# Altium PCB charging_device.PcbDoc (part 2 of 3)
Units mm, origin at the board's own origin, x right, y up, seen from the top; angles counter-clockwise.
Board outline 200.72 x 85.24 mm, 2 copper layers (Top Layer, Bottom Layer); 199 components, 123 nets, 612 pads, 55 vias.
Unrouted connection lines stored in the file: 5.
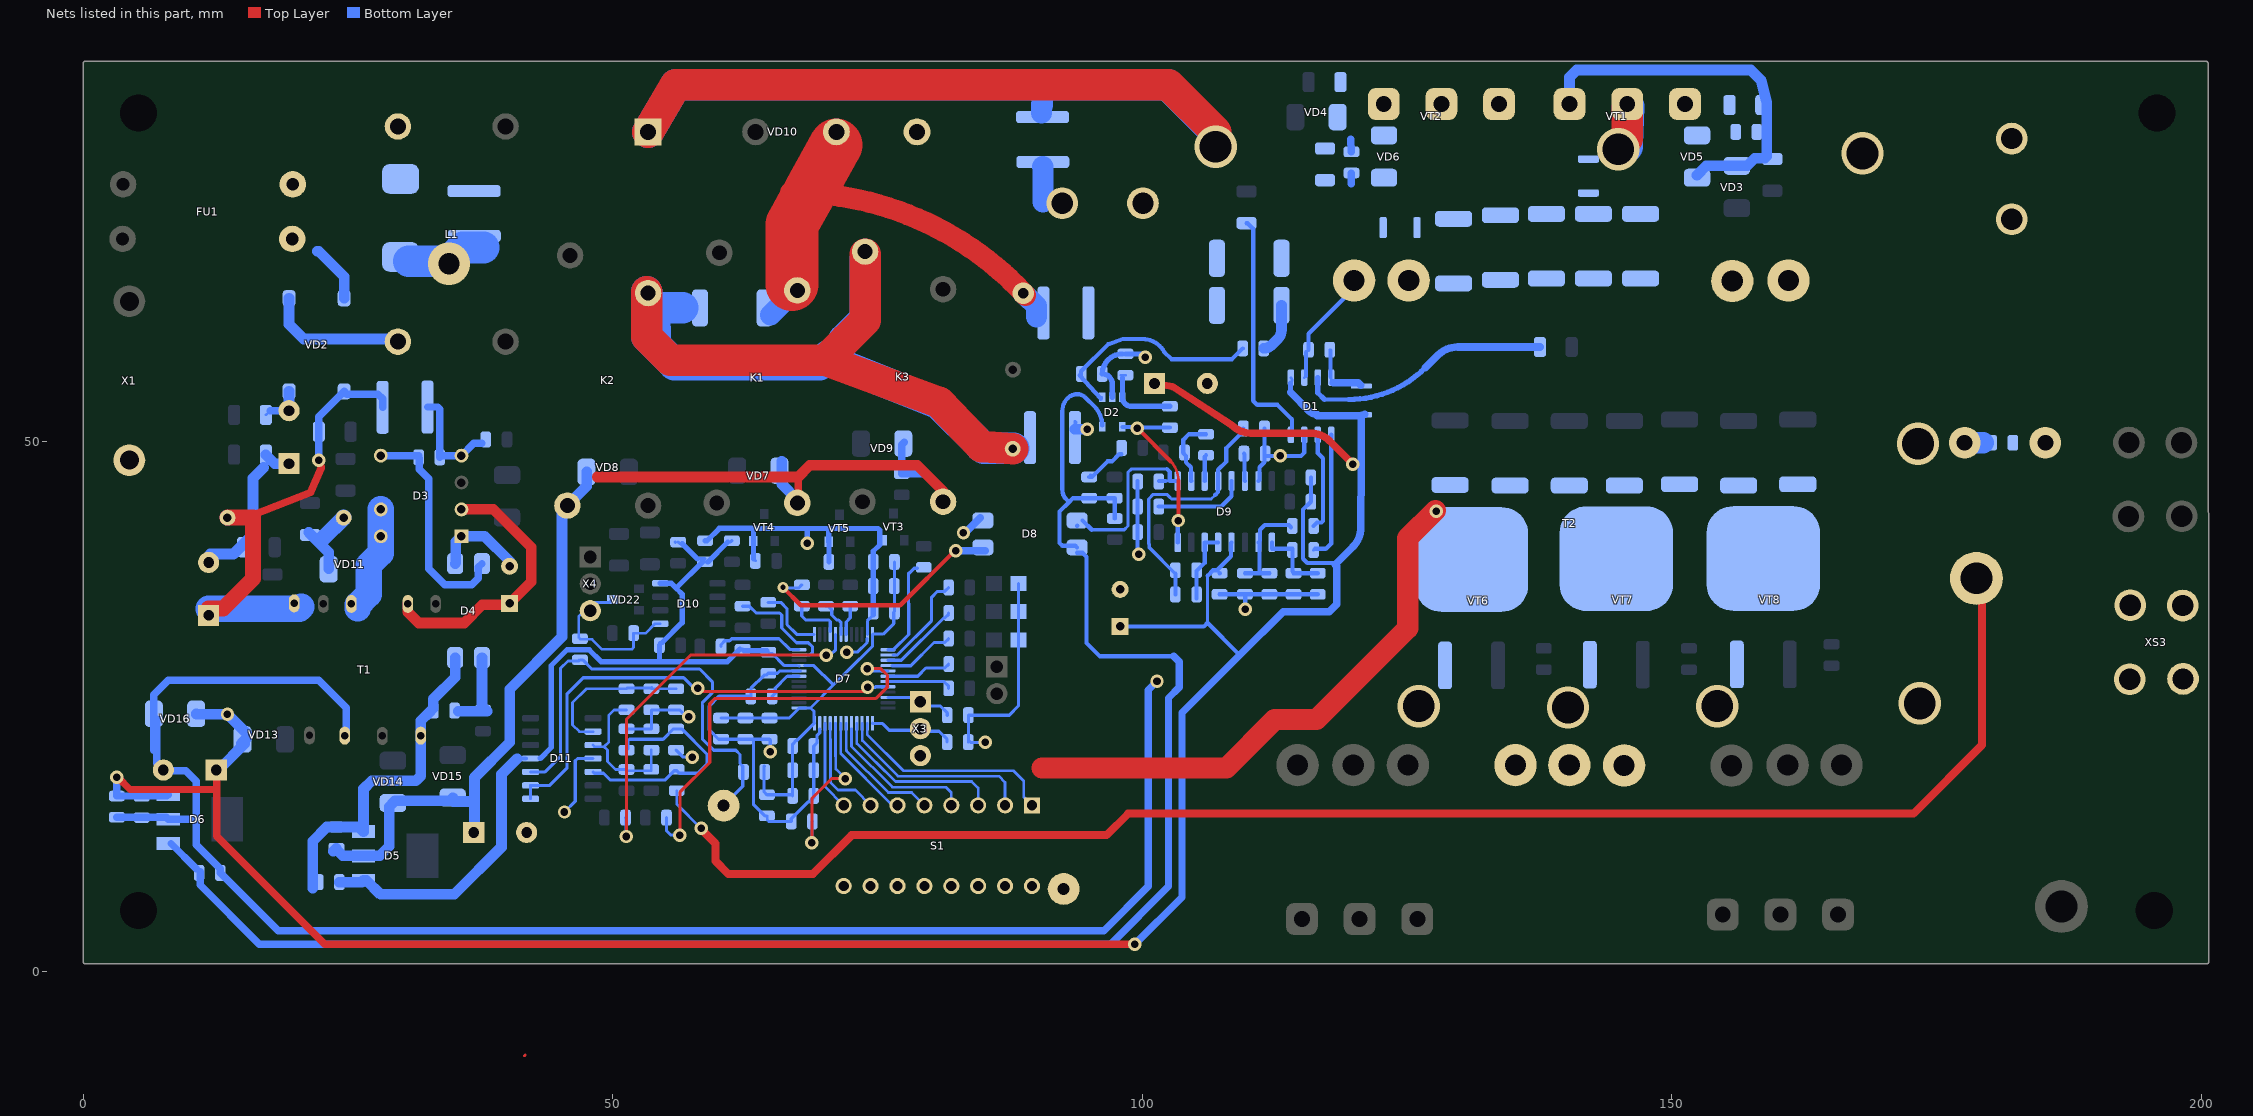
[diagram p2: the nets of this part, all layers, seen from the top]

## Part data (continued)
R46: library part R0805_IPC, "805, 27 kOhm, 1%", ManufacturePartName=0805S8F2702T5E, Part Name="Resistor 0805", ComponentLink1Description="on TME", ComponentLink1URL=https://www.tme.eu/en/details/smd0805-27k-1%25/smd-resistors/royal-ohm/0805s8f2702t5e/, Price="€ 0.00242"
R47: library part R0805_IPC, "0805, 100 Ohm, 1%", ManufacturePartName=0805S8F1000T5E, ComponentLink1Description="on TME", ComponentLink1URL=https://www.tme.eu/en/details/smd0805-100r-1%25/smd-resistors/royal-ohm/0805s8f1000t5e/, Part Name="Resistor 0805", Price="€ 0.00242"
R48 R49 R51: library part R0805_IPC, "0805, 100 Ohm, 5%", ManufacturePartName=0805S8J0101T5E, ComponentLink1Description="on TME", ComponentLink1URL=https://www.tme.eu/en/details/smd0805-100r/smd-resistors/royal-ohm/0805s8j0101t5e/, Part Name="Resistor 0805", Price="€ 0.00242"
R50: library part R0805_IPC, "0805, 24 kOhm, 1%", ManufacturePartName=0805WAF2402T10, ComponentLink1Description="on TME", ComponentLink1URL=https://www.tme.eu/ua/details/0805s8f2402t5e/rezistori-smd/royal-ohm/, Part Name="Resistor 0805", Price="€ 0.00242"
R52 R53 R54 R55 R56 R57 R58: library part R2512, "0.01 om, 1 w, ± 1%, 1500 ppm", ManufacturePartName=RL2512FK-070R01L, ComponentLink1Description="on Mouser", ComponentLink1URL=https://eu.mouser.com/ProductDetail/YAGEO/RL2512FK-070R01L?qs=BXCcY9r%252B08AD8tBH7JbvyA%3D%3D, Part Name="Resistor 2512", Price="€ 0,176"
R59 R60: library part R0805_IPC, "0805, 100 Ohm, 1%", ManufacturePartName=0805S8F1000T5E, Part Name="Resistro 0805", ComponentLink1Description="on TME", ComponentLink1URL=https://www.tme.eu/en/details/smd0805-100r-1%25/smd-resistors/royal-ohm/0805s8f1000t5e/, Price="€ 0.00242"
R61 R62 R63: library part R0805_IPC, "Resistor 0805, 5.1 kOhm, 5%, 0805S8J0512T5E", ManufacturePartName=0805S8J0512T5E, Part Name="Resistor 0805", Price=€0.01479
R64: library part R0805_IPC, "Resistor 0805, 510 Ohm, 5% 0805S8J0511T5E", ManufacturePartName=0805S8J0511T5E, Part Name="Resistor 0805", Price=€0.01479
R65: library part R0805_IPC, "Resisstor 0805, 51 kOhm, 5%, 0805S8J0513T5E", ManufacturePartName=0805WAJ0513T10, Part Name="Resistor 0805", Price=€0.01479
R66 R67: library part R0805_IPC, "Resistor 0805, 1 kOhm, 5%,  / 0805S8J0102T5E", ManufacturePartName=0805S8J0102T5E, Part Name="Resistor 0805", Price=€0.01479
R68: library part R0805_IPC, "Resistor 0805, 1 kOhm, 5%,  / 0805S8J0102T5E (1,8...500кОм) 50КГц", Part Name="Resistor 0805", ManufacturePartName=0805WAJ0102T10, Price=€0.01479
R69: library part R0805_IPC, "Resistor 0805, 1 kOhm, 5%,  / 0805S8J0102T5E", ManufacturePartName=0805WAJ0102T10, Part Name="Resistor 0805", Price=€0.01479
R70: library part R0805_IPC, "Ressistor 0805, 1 kOhm, 5% 0805S8J0102T5E", ManufacturePartName=0805WAJ0102T10, Part Name="Resistor 0805", Price=€0.01479
R71 R72 R73 R74: library part R0805_IPC, "Resistor 0805, 1 kOhm, 5%0805S8J0102T5E", ManufacturePartName=0805S8J0101T5E, Part Name="Resistor 0805", Price=€0.01160
R75: library part R0805MY, "Resistor 0805, 10 Ohm, 5% / 0805S8J0100T5E", ManufacturePartName=0805S8J0100T5E, Part Name="Resistor 0805", Price=€0.01160
R76: library part R2512, "Resistor 0805, 10 Ohm, 5% / 0805S8J0100T5E", ManufacturePartName=0805S8J0100T5E, Part Name="Resistor 0805", Price=€0.01160
R77: library part R1206_IPC, "Resistor 1206, 20 Ohm, 5%, 1206W4J0200T5E", ManufacturePartName=1206W4J0200T5E, ComponentLink1Description=datasheet, ComponentLink1URL=https://eu.mouser.com/datasheet/2/1365/1-3044649.pdf, ComponentLink2Description="on TME", ComponentLink2URL=https://www.tme.eu/ua/details/1206w4j0200t5e/rezistori-smd/royal-ohm/?brutto=0&currency=USD, Part Name="Resistor 1206", Price=$0.00280
R78 R80: library part R0805MY, "10 kOhm, 5%", ManufacturePartName=0805S8J0103T5E, Part Name="Resistor 0805", ComponentLink1Description="on TME", ComponentLink1URL=https://www.tme.eu/ua/ru/details/0805s8j0103t5e/rezistory-smd/royal-ohm/, Price=$0.00132
R79: library part R0805MY, "Resistor 1206, 20 Ohm, 5%, 1206W4J0200T5E", ManufacturePartName=1206W4J0200T5E, ComponentLink1Description="on TME", ComponentLink1URL=https://www.tme.eu/ua/details/1206w4j0200t5e/rezistori-smd/royal-ohm/?brutto=0&currency=USD, Part Name="Resistor 1206", Price=$0.00280
R81 R82 R83: library part R0805MY, "10 kOhm, 5%", ManufacturePartName=0805S8J0103T5E, ComponentLink1Description="on TME", ComponentLink1URL=https://www.tme.eu/ua/ru/details/0805s8j0103t5e/rezistory-smd/royal-ohm/, Part Name="Resistor 0805", Price=$0.00132
RU1: library part CU3225, "430 V 400 A Varistor 1 Circuit Surface Mount, MLCV 3225 (8063 Metric)", ManufacturePartName=B72650M0271K072, Part Name=Varistor, ComponentLink1Description="on digikey", ComponentLink1URL=https://www.digikey.at/en/products/detail/epcos-tdk-electronics/B72650M0271K072/1006567, Price=€0.46224
S1: library part SDIP16, "SMD_Switcher, DSHP08TSGET, 8-pins", ManufacturePartName=DSHP08TSGET, Part Name="Switcher smd", ComponentLink1Description="on Prom", ComponentLink1URL=https://prom.ua/ua/p2054320570-pereklyuchatel-dshp08tsget-pin.html, Price="42.12 ?"
T1: library part TRANS_2, "Transformator 74014_MYRRA", ManufacturePartName=74014_MYRRA, ComponentLink1Description="on TEM", ComponentLink1URL=https://www.tme.eu/ua/details/74010/transformatori-pcb/myrra/?brutto=0&currency=USD&gad_source=1&gclid=Cj0KCQjwxqayBhDFARIsAANWRnSOl6qUcqiiR8jCAnO5MGWbHAEPyGNAiL8MoGzMcmahcZQS1fRPZt0aAgjyEALw_wcB, Part Name=Transformator, Price="usd 2.22"
T2: library part TRANS_ETD_54_28_19, "ETD54/28/19 Ui=2400 AL=5580nH", ManufacturePartName=TP4A-ETD54/28/19, Part Name="Transformer core", ComponentLink1Description=Datasheet, ComponentLink1URL=https://www.tdk-electronics.tdk.com/inf/80/db/fer/etd_54_28_19.pdf, Price="54,00 грн*2, Voron"
VD1: library part 1N400X_VER, "RF Diode PIN - Single 400V 11.5 W", ManufacturePartName=MA4P7104F-1072T, Part Name="RF Diod, MACOM Technology", ComponentLink1Description="on digikey", ComponentLink1URL=https://www.digikey.at/en/products/detail/macom-technology-solutions/MA4P7104F-1072T/4429653, Price=€3.85500
VD2: library part DFXXS, "600 V Surface Mount 4-SDIP", ManufacturePartName=DF06STR-ND, Part Name="Bridge Rectifier Single Phase", ComponentLink1Description="on digikey", ComponentLink1URL=https://www.digikey.at/en/products/detail/onsemi/DF06S/974208, Price=€0.28516
VD3 VD4: library part 1N400X_VER, "Diode 40 V 1A Surface Mount SOD-123", ManufacturePartName=1N5819HW-7-F, Part Name="Diod smd", Price=$0.12274
  VD3: ComponentLink1Description="on Digikey", ComponentLink1URL=https://www.digikey.at/en/products/detail/diodes-incorporated/1N5819HW-7-F/814970
VD5 VD6: library part ZENER_SOD232, "20 V 500 mW ±5% Surface Mount SOD-123F", ManufacturePartName=MMSZ5250B, Part Name="Zener Diode", ComponentLink1Description="on digikey", ComponentLink1URL=https://www.digikey.at/en/products/detail/diotec-semiconductor/MMSZ5250B/22190821, Price=€0.04660
VD7 VD8 VD9: library part VD7_5, "1000 V 1A Surface Mount DO-214AC (SMA)", ManufacturePartName=S1M, Part Name=Diode, ComponentLink1URL=https://www.digikey.at/en/products/detail/smc-diode-solutions/S1M/6022596, Price=€0.03636, Vaue="1000 V, 1 A"
  VD7: ComponentLink1Description="on Didikey"
  VD8 VD9: ComponentLink1Description="on Digikey"
VD10: library part 4GBXXX, "Single Phase Standard 1 kV Through Hole GBJ", ManufacturePartName=GBJ3510, Part Name="Bridge Rectifier Single Phase", ComponentLink1Description="on digikey", ComponentLink1URL=https://www.digikey.at/en/products/detail/smc-diode-solutions/GBJ3510/7244896, Price=€0.79502
VD11 VD12: library part 1N4148WS, "100V 1A, SMA", ManufacturePartName="SS110 SMA", Part Name="DIODE SCHOTTKY", ComponentLink1URL=https://www.digikey.si/en/products/detail/smc-diode-solutions/SS110/16184148, Price=€0.05678
  VD11: ComponentLink1Description=onDigikey
  VD12: ComponentLink1Description="on Digikey"
VD13 VD14: library part 1N4148WS, "DIODE SCHOTTKY - SS110 SMA, 100V 1A, SMA", ManufacturePartName="SS110 SMA", Part Name="DIODE SCHOTTKY", ComponentLink1Description="on Digikey", ComponentLink1URL=https://www.digikey.si/en/products/detail/smc-diode-solutions/SS110/16184148, Price=€0.05678
VD15: library part BZV55, "4.3 V 500 mW ±5% Surface Mount LLDS; MiniMelf", ManufacturePartName=BZV55-C4V3, Part Name="Zener Diode", ComponentLink1Description="on digikey", ComponentLink1URL=https://www.digikey.si/en/products/detail/nexperia-usa-inc/BZV55-C4V3-115/1155576, Price=€0.05858
VD16: library part BZV55, "24.4V Clamp 16.4A Ipp Tvs Diode Surface Mount DO-214AC", ManufacturePartName=SMAJ15A, Part Name="TVS DIODE", ComponentLink1Description="on digikey", ComponentLink1URL=https://www.digikey.si/en/products/detail/w%C3%BCrth-elektronik/SMAJ15A/11479345, Price=$0.19900
VD17: library part KP-2012SURK, "Led, FYLS-0805HD, червоний.", ManufacturePartName=FYLS-0805HD, Part Name="Led smd", ComponentLink1Description="on kosmodrom", ComponentLink1URL=http://www.kosmodrom.com.ua/prodlist.php?page=0&name=fyls-0805, Price="2.5 грн"
VD18: library part KP-2012SURK, "Led, FYLS-0805PGC, Зелений.", ManufacturePartName=FYLS-0805HD, Part Name="Led smd", ComponentLink1Description="on Kosmodrom", ComponentLink1URL=http://www.kosmodrom.com.ua/prodlist.php?page=0&name=fyls-0805, Price="2.5 грн"
VD19: library part KP-2012SURK, "Led, FYLS-0805BUWC, Білий.", ManufacturePartName=FYLS-0805BUWC, Part Name="Led smd", ComponentLink1Description="on Kosmodrom", ComponentLink1URL=http://www.kosmodrom.com.ua/prodlist.php?page=0&name=fyls-0805, Price="2.5 грн"
VD20 VD21: library part D_2IN1, "1 Pair Common Cathode 200 V 15A Through Hole TO-247-3", ManufacturePartName=MUR3020WTPBF, Part Name="Diode Array", ComponentLink1Description="on digikey", ComponentLink1URL=https://www.digikey.si/en/products/detail/vishay-general-semiconductor-diodes-division/VS-MUR3020WTPBF/811527?s=N4IgTCBcDaILIFUBKBmADGNB1AKgBQCEAxEAXQF8g, ComponentLink2Description=datasheet, ComponentLink2URL=https://www.vishay.com/docs/94080/vs-mur3020wt-n3.pdf
  VD20: Price="65,25 грн/шт,Imrad"
  VD21: Price="65,25 грн/шт, Imrad"
VD22: library part CDSOT23-SM712, "26V, 14V Clamp 17A (8/20µs) Ipp Tvs Diode Surface Mount SOT-23-3", Part Name="Diode Surface Mount", ComponentLink1Description="on digikey", ComponentLink1URL=https://www.digikey.si/en/products/detail/bourns-inc/CDSOT23-SM712/1630592?s=N4IgTCBcDaIMIBEDKB5AKmAzAWiQWQHYBGCAXQF8g, ManufacturePartName=CDSOT23-SM712, Price=$0.80900
VT1 VT2: library part IRG4PH30, "N-Channel 900 V 11.5A (Tc) 54W (Tc) Through Hole TO-247-3", ManufacturePartName=C3M0280090D, Part Name="Transistor TO - 247 - 3", ComponentLink1Description="on digikey", ComponentLink1URL=https://www.digikey.at/en/products/detail/wolfspeed-inc/C3M0280090D/5764683, Price=€4.93000
VT3 VT4 VT5: library part IRLML2803, "N-Channel Enhancement-Mode MOSFET (TMOS), IRLML2803, 30V; 1.2A; 0.4W; SOT23", ManufacturePartName=IRLML2803TRPBF, Part Name="Transistor SOT-23", ComponentLink1Description="on digikey", ComponentLink1URL=https://www.digikey.si/en/products/detail/infineon-technologies/IRLML2803TRPBF/811435, Price=€0.13148
VT6: library part IRG4PH30, "N-Channel 75 V 80A (Tc) 140W (Tc) Surface Mount D2PAK", ManufacturePartName=IRFS3607PBF-ND, Part Name="Transistor D2PAK", ComponentLink1Description="on digikey", ComponentLink1URL=https://www.digikey.si/en/products/detail/infineon-technologies/IRFS3607PBF/1928144?s=N4IgTCBcDaIJICUBiBlAzANgAwHYAKARkiALoC%2BQA, Price=$1.42
VT7 VT8: library part IRG4PH30, "Transistor - IRFS3607PbF,   / N-Channel 75 V 80A (Tc) 140W (Tc) Surface Mount D2PAK", ManufacturePartName=IRFS3607PBF-ND, Part Name="Transistor D2PAK", ComponentLink1Description="on digikey", ComponentLink1URL=https://www.digikey.si/en/products/detail/infineon-technologies/IRFS3607PBF/1928144?s=N4IgTCBcDaIJICUBiBlAzANgAwHYAKARkiALoC%2BQA, Price=$1.42
X1: library part DG300-7.5-3P, "2EDGRC-7.5-03P-14-00A(H), Клема вилка винтова кутова,7,5 мм,кількість контактів 3: 15А 300В зелена,на плату", Part Name="Pluggable terminal block", ComponentLink1Description="on TME", ComponentLink1URL=https://www.tme.eu/en/details/2edgrc-7.5-03p/pluggable-terminal-blocks/degson-electronics/2edgrc-7-5-03p-14-00a-h/, ManufacturePartName=2EDGRC-7.5-03P-14-00A(H), Price=0.248
X2: library part DG301S-5.0-02P, "Terminal Block - Terminal Block - 15EDGRC-2.5-02P-14-00L(H), 2 Position  Header, Male Pins, 2.5mm", ManufacturePartName=15EDGRC-2.5-02P-14-00L(H), Part Name=Connector, ComponentLink1Description="on Digikey", ComponentLink1URL=https://www.digikey.kr/en/products/detail/degson/15EDGRC-3-5-02P-14-00L-H/22266315, Price=?1,200.00000
X3: library part PLS3_ukr, "PLS-40-BLACK, Планка штирьова на плату пряма, крок 2,54мм 1x40 контакт. Колір: чорний. Контакты 6 и 3 мм", ManufacturePartName="PLS-40 BLACK", Part Name="Планка штирьова на плату", ComponentLink1Description="on kosmodrom", ComponentLink1URL=http://www.kosmodrom.com.ua/prodlist.php?name=PLS-40&page=0, Price=грн2,50
X4: library part DG301S-5.0-03P, "DG308-2.54-03P-14-00AH, 3P, 2.54mm", ManufacturePartName=DG308-2.54-03P, Part Name="Connector DG", ComponentLink1Description=data, ComponentLink1URL=https://biakom.com/store/119873-na-platu/26815-dg308-254-03p-14-00ah, ComponentLink2Description="on TME", ComponentLink2URL=https://www.tme.eu/ua/ru/details/dg308-2.54-03p/klemmnye-kolodki-dlia-pechatnykh-plat/degson-electronics/dg308-2-54-03p-14-00ah/, Price=$0.342
XS3: ManufacturePartName=*PCB-11(M4)FIX&FASTEN, Part Name=Connector, ComponentLink1Description="on TME", ComponentLink1URL=https://www.tme.eu/ua/ru/details/pcb-11m4/paechnye-shtifty-pcb/fix-fasten/pcb-11-m4/, Price=0.242
XS4: "0.01 om, 1 w, ± 1%  / 1500 ppm/K", ComponentLink1Description="on TME", ComponentLink1URL=https://www.tme.eu/ua/ru/details/pcb-11m4/paechnye-shtifty-pcb/fix-fasten/pcb-11-m4/
XS1: PDIF_I_PID=XT1, PDIF_TY=11100
XS2: PDIF_I_PID=XT1

## Free pads (board coordinates)
  round 1.524 hole 3.5: 24(5.204,81.026) 24(5.207,5.715) 24(195.58,5.715) 24(195.834,81.026)

## Via types
v1: diameter 1.27, hole 0.711, Top Layer to Bottom Layer, 36 vias
v2: diameter 4, hole 3, Top Layer to Bottom Layer, 15 vias
v3: diameter 1.016, hole 0.508, Top Layer to Bottom Layer, 2 vias
v4: diameter 4, hole 2, Top Layer to Bottom Layer, 1 vias
v5: diameter 2, hole 1, Top Layer to Bottom Layer, 1 vias

## Nets (pads, with @x,y where several pads share a name; then routed paths per layer and width w, separated by ;. In a path a pad name is that pad's centre, name@x,y a point inside that pad or via, vN(x,y) a via of type N, cw(c..) or ccw(c..) an arc to the next point about the centre after c; other vN are vias at no path point)
"+ 3.3V": C25.1 C32.2 C33.2 C34.2 C35.2 C36.2 C37.2 C38.2 C39.2 C40.2 C41.2 C42.2 C55.2 D5.2 D7.1 D7.9 D7.24 D7.48 D10.8 D11.4 R25.2 R80.2 R81.1 R82.1 R83.1 | length 126.5
  Bottom Layer w0.254: D7.9@67.597,28.842 D7.9@67.628,28.811 ; 70.773,27.064 70.9,27.064
  Bottom Layer w0.3: 54.208,29.218 54.414,29.424 ; R83.1@54.414,31.017 R83.1@54.676,31.017 ; R80.2@55.906,40.505 R80.2@55.914,40.497 ; 56.049,36.101 56.049,36.215 ; R80.2@56.176,40.505 56.303,40.378 R80.2@56.553,40.378 ; C55.2@58.002,38.929 C55.2@58.685,38.929 ; C55.2@58.466,38.632 C55.2@58.716,38.632 ; C39.2@60.24,23.893 C35.2@62.526,23.893 C32.2@64.812,23.893 66.679,23.893 D7.1@67.597,24.811 ; R81.1@60.864,40.514 61.129,40.514 R81.1@61.256,40.641 R81.1@61.248,40.649 ; R82.1@62.022,30.402 R82.1@62.272,30.402 R82.1@62.415,30.259 ; R25.2@64.288,19.337 64.304,19.337 64.288,19.321 64.288,16.924 C42.2@64.558,16.654 66.876,16.654 C37.2@66.987,16.543 C41.2@66.987,18.956 C34.2@66.987,21.242 66.987,21.425 67.351,21.789 67.444,21.789 D7.48@69.047,23.392 ; C38.2@64.542,30.259 C38.2@64.685,30.116 64.812,29.989 65.062,29.989 66.209,28.842 D7.9@67.381,28.842 ; D7.1@67.597,24.842 68.678,24.842 ; D7.9@68.114,28.842 68.995,28.842 70.773,27.064 ; D7.48@69.016,23.392 69.016,24.504 68.678,24.842 ; C33.2@76.607,38.641 C40.2@76.607,33.942 76.533,33.868 76.533,32.811 75.537,31.815 74.57,31.815 D7.24@74.547,31.792 74.547,30.697 72.242,28.392 72.242,28.405 70.9,27.064 68.678,24.842
  Bottom Layer w0.4: 40.969,20.066 D11.4@41.783,20.066
  Bottom Layer w0.5: 43.17,20.082 44.196,21.108 44.196,28.855 45.68,30.34 47.777,30.34 48.899,29.218 54.208,29.218 60.838,29.218 R82.1@62.022,30.402 ; 54.414,29.424 R83.1@54.414,30.767 ; D10.8@54.492,36.609 55.541,36.609 55.922,36.228 ; R83.1@54.676,31.017 56.557,32.898 56.557,35.593 56.049,36.101 ; 56.049,36.215 C55.2@58.466,38.632 ; R80.2@56.553,40.378 C55.2@58.002,38.929 ; C55.2@58.982,38.632 R81.1@60.864,40.514 ; R82.1@62.415,30.259 C38.2@64.542,30.259
  Bottom Layer w1: C25.1@24.193,8.398 26.291,8.398 D5.2@26.464,8.571 26.735,8.571 28.075,7.231 28.083,7.239 35.028,7.239 39.497,11.708 39.497,18.594 40.969,20.066
"+ 5V": C20.1 C22.1 D5.3 K1.4 K2.1 K3.4 R39.1 VD7.2 VD8.2 VD9.2 VD14.2 VD15.2 | length 104.8
  Top Layer w0.254: K1.4@67.437,44.212 K1.4@67.503,44.277
  Top Layer w0.7: K1.4@67.513,44.531 67.513,46.658
  Top Layer w1: 48.536,46.658 67.513,46.658 68.623,47.768 78.767,47.768 K3.4@81.18,45.355
  Bottom Layer w0.7: VD9.2@77.517,49.927 77.295,49.705 R39.1@77.295,46.974 79.597,46.974 K3.4@81.216,45.355
  Bottom Layer w1: C22.1@23.609,11.307 C22.1@23.906,11.605 ; C22.1@24.033,11.357 24.519,10.871 D5.3@26.464,10.871 28.008,10.871 28.908,11.77 28.908,15.531 VD14.2@29.24,15.864 29.438,16.062 VD15.2@34.828,16.062 ; VD15.2@34.885,16.381 34.979,16.288 34.979,16.01 36.949,16.01 ; C20.1@36.949,13.16 36.949,16.01 ; VD8.2@47.53,47.133 47.53,45.768 K2.1@45.72,43.958 45.212,43.45 45.212,31.579 40.259,26.626 40.259,21.59 36.949,18.28 36.949,16.01 ; VD7.2@65.96,48.149 65.96,45.99 K1.4@67.484,44.466
"+ 310V PWR": C10.2 C12.1 C14.2 VD10.1 VT1.2 | length 131.1
  Top Layer w3: VD10.1@53.34,79.248 55.961,83.693 102.489,83.693 106.934,79.248 v2(106.934,77.851) ; v2(144.961,77.613) 144.961,77.763 145.807,78.608 VT1.2@145.807,81.534
  Bottom Layer w0.254: 90.48,83.693 90.592,83.581
  Bottom Layer w2: C14.2@90.48,81.026 90.48,81.859 90.592,81.747 90.592,83.581
  Bottom Layer w3: VD10.1@53.34,79.248 55.974,83.693 90.48,83.693 102.415,83.693 106.807,79.301 v2@106.807,77.363 ; v2(144.961,77.613) 145.21,77.862 145.807,77.862 145.813,78.069 VT1.2@145.923,81.641
  other v2: 168.021,77.216
GND: C20.2 C22.2 C25.2 C28.1 C29.1 C30.1 C31.1 C32.1 C33.1 C34.1 C35.1 C36.1 C37.1 C38.1 C39.1 C40.1 C41.1 C42.1 C43.1 C47.1 C48.1 C55.1 D4.2 D5.1 D7.8 D7.23 D7.47 D8.2 D10.5 D11.11 R24.2 R32.2 R38.2 R42.2 R45.1 R52.2 R53.2 R54.2 R55.2 R56.2 R57.2 R58.2 R60.1 R78.1 S1.9 S1.10 S1.11 S1.12 S1.13 S1.14 S1.15 S1.16 T1.10 VD17.2 VD18.2 VD19.2 VD22.3 VT3.2 VT4.2 VT5.2 VT6.2 VT7.2 VT8.2 X3.3 X4.3 XS2.1 | length 219.1
  Top Layer w0.254: 41.643,-8.007 41.743,-7.907 ; v1@68.368,40.286 v1(68.368,40.413)
  Top Layer w2: 90.533,19.177 107.95,19.177 112.522,23.749 116.459,23.749 125.074,32.364 125.074,40.873 v1@127.698,43.497
  Bottom Layer w0.254: X4.3@47.413,33.936 X4.3@47.244,33.936 ; VD22.3@49.953,35.085 49.674,34.805 48.114,34.805 X4.3@47.244,33.936 ; D10.5@54.492,32.799 54.017,32.799 53.128,31.91 R78.1@51.969,31.91 51.969,30.551 51.82,30.402 48.959,30.402 48.036,31.325 46.966,31.325 C28.1@46.905,31.386 46.778,31.513 46.778,33.469 X4.3@47.244,33.936 ; R38.2@63.288,38.925 R38.2@63.479,38.735 ; VT4.2@63.288,40.622 VT4.2@63.288,40.856 ; C42.1@64.558,14.654 64.595,14.618 64.595,14.262 64.743,14.113 65.938,14.113 65.955,14.13 ; C29.1@83.576,21.623 83.592,21.639 83.67,21.717 83.797,21.59 v1(85.18,21.59)
  Bottom Layer w0.3: v1(45.445,15.018) 46.461,16.034 46.461,19.861 46.67,20.071 D11.11@48.141,20.071 ; C43.1@51.303,22.868 C48.1@53.652,22.868 C47.1@53.652,24.659 R60.1@55.986,24.659 56.302,24.659 56.942,24.019 v1(57.192,24.019) ; R45.1@55.986,20.865 56.653,20.198 v1(57.51,20.198) ; C42.1@64.558,14.654 64.375,14.654 63.288,15.74 63.288,21.893 ; v1(64.876,20.706) 64.876,21.829 C32.1@64.812,21.893 63.288,21.893 ; 65.955,14.13 R32.2@66.86,14.13 66.86,14.38 68.476,15.996 68.624,15.996 68.987,16.359 C37.1@68.987,16.543 C41.1@68.987,18.956 C34.1@68.987,21.242 69.284,21.539 69.284,22.232 69.547,22.495 D7.47@69.547,22.868 ; D7.8@67.733,28.329 65.764,28.329 65.551,28.116 C38.1@64.685,28.116 64.517,27.948 64.304,27.948 63.05,26.694 C31.1@63.05,25.941 60.029,25.941 59.109,25.021 59.109,22.774 59.99,21.893 C39.1@60.24,21.893 C35.1@62.526,21.893 63.288,21.893 ; v1(72.115,30.116) 73.107,30.116 74.02,31.029 D7.23@74.02,31.374 ; D7.23@74.047,31.792 74.047,33.065 C40.1@74.607,33.625 ; C29.1@83.592,21.639 C30.1@83.592,24.163 87.443,24.163 88.307,25.027 VD19.2@88.307,31.275 VD18.2@88.307,33.942 VD17.2@88.307,36.609
  Bottom Layer w0.5: C55.1@58.716,40.632 58.9,40.632 60.073,41.805 63.628,41.805 ; R38.2@63.288,38.925 VT4.2@63.288,40.622 ; VT4.2@63.288,40.856 63.288,41.791 70.4,41.791 ; v1(68.368,40.413) 68.368,41.683 ; R42.2@70.416,38.641 70.416,40.53 VT5.2@70.4,40.546 70.4,41.791 ; C40.1@74.607,33.625 C40.1@74.607,33.942 C33.1@74.607,38.641 74.607,39.64 75.226,40.259 75.226,41.621 75.057,41.791 70.4,41.791
  Bottom Layer w0.7: v1(83.125,41.402) 83.28,41.402 D8.2@84.693,42.815
  Bottom Layer w1: 21.669,7.835 21.669,12.262 23.011,13.605 C22.2@23.906,13.605 26.03,13.605 D5.1@26.464,13.171 26.464,17.195 27.227,17.957 31.418,17.957 31.877,18.416 T1.10@31.877,22.225 31.877,23.623 32.669,24.416 32.669,24.421 33.05,24.802 33.05,25.687 35.116,27.752 D4.2@35.116,29.591
  other v1: 127.762,43.434
"GND  PWR": C1.2 C5.1 C8.1 C9.1 C13.2 C14.1 C23.2 C24.2 C26.2 C27.2 C49.2 C50.1 C51.1 C53.1 C54.1 C56.1 D1.3 D2.2 D6.2 D9.7 R4.1 R10.2 R12.2 R61.1 R63.1 R67.1 R68.2 R69.2 R72.1 R74.1 T1.8 VD10.4 VD16.1 | length 212.4
  Bottom Layer w0.254: C14.1@90.617,75.946 C14.1@90.617,76.403 ; C8.1@93.65,51.181 93.65,51.918 C8.1@93.776,51.792 ; v1(94.807,51.181) 94.998,51.181 v1@95.124,51.307 ; D2.2@97.016,54.356 D2.2@97.016,54.556 ; R4.1@98.125,58.277 R4.1@98.425,58.277 ; v1@99.946,58.277 cw(c99.946,57.943) v1(100.28,57.943)
  Bottom Layer w0.4: C56.1@94.996,46.656 C56.1@95.246,46.656 ; C56.1@95.121,46.781 C56.1@95.246,46.656 ; R63.1@98.045,48.811 97.833,48.811 97.155,48.133 96.731,48.133 95.25,46.652 C56.1@95.246,46.656 ; R67.1@99.569,41.445 99.568,39.497 v1(99.695,39.37) ; R67.1@99.569,41.445 C51.1@99.569,43.858 R61.1@99.569,46.271 ; C50.1@107.315,35.576 C54.1@109.71,35.576 ; v1(109.728,34.163) 109.728,35.558 C54.1@109.71,35.576 ; D9.7@110.98,46.275 111.081,46.376 111.081,47.581 111.554,48.054 R68.2@111.554,48.72 ; R69.2@111.554,51.244 R68.2@111.554,48.72 ; D1.3@115.316,50.64 115.316,48.969 114.988,48.641 v1(113.046,48.641) 111.633,48.641 R68.2@111.554,48.72 ; R72.1@116.586,35.576 C53.1@114.3,35.576 R74.1@112.014,35.576 C54.1@109.71,35.576
  Bottom Layer w0.5: D2.2@97.183,54.18 97.183,55.441 ccw(c96.236,55.441) C5.1@96.236,56.388 cw(c98.125,56.388) R4.1@98.125,58.277 ; R4.1@98.425,58.277 v1@99.946,58.277
  Bottom Layer w0.7: C27.2@3.175,14.526 7.834,14.526 D6.2@8.019,14.341 10.531,14.341 10.668,14.478 ; 6.666,20.857 VD16.1@6.666,24.289 6.666,26.099 8.031,27.464 22.255,27.464 24.846,24.873 T1.8@24.846,21.901 ; VD16.1@6.92,23.778 6.928,23.77 6.928,19.618 C24.2@7.563,18.983 C24.2@7.643,18.903 ; C24.2@7.742,18.804 C24.2@7.643,18.903 ; v1(101.4,27.359) 100.584,26.543 100.584,8.001 96.393,3.81 18.415,3.81 13.085,9.14 12.938,9.287 12.938,9.668 10.668,11.938 10.668,14.478 ; C24.2@7.643,18.903 9.686,18.903 10.668,17.921 10.668,14.478
  Bottom Layer w1: C8.1@93.65,51.181 v1(94.807,51.181)
  Bottom Layer w2: C14.1@90.617,75.946 90.627,75.936 90.627,72.63
NetC1_1: C1.1 C23.1 C24.1 C27.1 C49.1 C50.2 D1.5 D6.3 D9.12 R71.2 R73.2 VD1.1 VD13.2 VD16.2 | length 249
  Top Layer w0.7: v1(3.175,18.288) 3.272,18.288 4.415,17.145 12.603,17.145 ; C24.1@12.603,18.407 12.603,17.145 ; v1(99.314,2.54) 22.795,2.54 12.603,12.732 12.603,17.145 ; C1.1@101.161,55.487 102.864,55.196 108.476,51.544 ccw(c110.272,53.34) 110.272,50.8 115.915,50.8 cw(c115.915,48.26) 117.711,50.056 v1(119.888,47.879)
  Bottom Layer w0.254: 109.151,29.909 109.283,29.909 ; D1.5@114.046,56.04 cw(c113.739,55.733) D1.5@114.173,55.733
  Bottom Layer w0.3: 106.172,32.887 106.172,35.044 106.161,35.055 106.161,37.311 106.172,37.322
  Bottom Layer w0.4: C49.1@97.917,32.54 105.825,32.54 106.172,32.887 109.151,29.909 ; 106.172,37.322 106.696,37.846 107.061,37.846 108.384,39.169 108.384,40.419 D9.12@108.44,40.475 ; C50.2@107.315,37.576 C50.2@107.324,37.576 ; R71.2@115.935,46.609 R73.2@115.935,44.323 115.189,43.577 115.189,38.937 115.596,38.53 118.061,38.53 118.212,38.379 118.364,38.227
  Bottom Layer w0.44: 114.01,54.646 D1.5@114.01,55.571
  Bottom Layer w0.7: v1(3.175,18.288) C27.1@3.175,16.526 7.904,16.526 D6.3@8.019,16.641 ; v1(99.314,2.54) 103.759,6.985 103.759,24.384 109.283,29.909 113.317,33.942 117.657,33.942 118.364,34.649 118.364,38.227 ; 114.01,54.646 115.781,52.875 ccw(c116.499,53.594) 116.499,52.578 ; 116.54,52.451 VD1.1@120.691,52.451 ; 118.212,38.379 119.906,40.072 ccw(c118.11,41.868) 120.65,41.868 120.673,47.876 VD1.1@120.691,52.451 ; VD1.1@121.031,52.578 120.747,52.472 VD1.1@120.691,52.451
  Bottom Layer w1: VD16.2@10.666,24.289 10.692,24.263 13.593,24.263 v1(13.619,24.236) 15.429,22.426 15.429,22.003 VD13.2@14.909,21.483 ; C24.1@12.095,18.729 12.78,19.413 12.78,19.022 VD13.2@15.24,21.483
NetC2_1: C2.1 C15.1 C18.1 R15.2 R19.2 T1.6 VD2.3 | length 44.4
  Top Layer w0.254: 16.032,42.815 16.032,43.069
  Top Layer w0.7: 16.032,43.069 21.464,45.196 22.5,47.564 v1(22.233,48.246)
  Top Layer w1.5: C15.1@11.841,34.235 13.215,34.235 16.032,37.051 16.032,42.815 C18.1@13.617,42.815
  Bottom Layer w0.7: v1(22.233,48.246) 22.249,48.262 R19.2@22.249,50.927 22.249,52.355 VD2.3@24.631,54.737 24.885,54.483 27.834,54.483 28.27,54.047 C2.1@28.27,53.238
  Bottom Layer w2: 15.905,34.235 16.032,34.362 ; 19.334,34.235 T1.6@19.461,34.362
  Bottom Layer w2.5: C15.1@11.841,34.235 15.905,34.235 19.334,34.235 20.416,34.235 20.604,34.423
NetC2_2: C2.2 C16.2 C17.2 C19.1 D3.1 D3.4 D4.3 R18.1 R22.2 VD2.4 | length 23.3
  Bottom Layer w0.254: R18.1@17.248,52.527 R18.1@17.64,52.919
  Bottom Layer w0.7: R18.1@17.64,52.919 C16.2@19.431,52.919 ; C2.2@32.512,53.264 33.468,53.264 33.669,53.063 C19.1@33.669,48.514 33.828,48.673 D3.4@35.717,48.673 36.868,49.824 R22.2@37.656,49.824
  Bottom Layer w1: C16.2@19.431,52.919 VD2.4@19.431,54.737 ; D4.3@35.116,38.481 35.19,38.556 35.19,40.526 D3.1@35.717,41.053 37.894,41.053 40.259,38.687 C17.2@40.259,38.222
NetC3_1: C3.1 C6.1 D1.6 R8.1 R11.2 R84.2 R85.2 R86.2 R87.2 T2.20 T2.21 VD5.1 VT1.3 VT2.2 | length 11.1
  Bottom Layer w0.254: D1.6@115.316,56.04 D1.6@115.475,56.199 ; C3.1@115.475,58.437 C3.1@115.712,58.674 ; T2.21@120.091,64.667 T2.21@120.091,65.202
  Bottom Layer w0.4: D1.6@115.475,56.199 C3.1@115.475,58.437 ; C3.1@115.712,58.674 115.712,60.186 T2.21@120.142,64.616
NetC3_2: C3.2 D1.8 VD1.2 | length 6
  Bottom Layer w0.254: C3.2@117.712,58.674 C3.2@117.784,58.602 ; D1.8@117.784,56.112 D1.8@117.856,56.04 117.856,55.713 D1.8@118.027,55.542
  Bottom Layer w0.4: D1.8@117.784,56.112 C3.2@117.784,58.602
  Bottom Layer w0.7: D1.8@118.027,55.542 120.416,55.542 VD1.2@120.65,55.308
NetC4_1: C4.1 L1.4 RU1.1 VD2.1 X1.3 | length 22.1
  Bottom Layer w0.254: RU1.1@29.972,67.437 30.322,67.437 RU1.1@30.728,67.031 ; v4(34.544,66.802) v4@34.544,67.031
  Bottom Layer w1: VD2.1@19.431,63.537 19.431,61.087 20.828,59.69 L1.4@29.718,59.69
  Bottom Layer w3: RU1.1@30.728,67.031 34.544,67.031 35.839,68.326 37.803,68.326
NetC4_2: C4.2 FU1.2 L1.1 RU1.2 VD2.2 | length 5.6
  Bottom Layer w1: 22.098,67.977 22.233,67.977 24.631,65.578 VD2.2@24.631,63.537
NetC5_2: C5.2 D2.1 R7.2 | length 21.4
  Bottom Layer w0.254: C5.2@94.096,56.261 C5.2@94.236,56.134 ; D2.1@96.093,54.053 D2.1@96.19,54.18
  Bottom Layer w0.4: C5.2@94.096,56.261 D2.1@96.093,54.053 ; C5.2@94.234,56.134 94.234,56.642 96.774,59.182 98.171,59.69 100.045,59.69 ; 100.045,59.684 cw(c100.045,57.37) 101.788,58.892 ; 101.783,58.888 cw(c100.018,57.346) 102.076,58.468 102.759,57.785 108.474,57.785 R7.2@109.49,58.801
NetC6_2: C6.2 R5.1 R8.2 VD3.1 VD5.2 VT1.1 | length 35.3
  Bottom Layer w1: VT1.1@140.357,82.399 140.357,84.393 141.054,85.09 157.48,85.09 158.472,84.098 158.951,82.168 158.98,82.049 158.98,76.962 158.788,76.77 157.861,76.77 157.132,76.041 VD3.1@156.163,76.041 153.277,76.041 VD5.2@152.4,75.164
NetC7_1: C7.1 C11.1 R7.1 R9.1 R10.1 R12.1 VD6.1 VT2.3 | length 5.9
  Bottom Layer w0.7: 119.761,74.323 C7.1@119.761,75.363
  Bottom Layer w1: R7.1@111.49,58.801 ccw(c111.49,59.826) 112.214,59.101 112.804,59.69 ccw(c111.946,60.548) 113.159,60.548 R10.1@113.159,62.865
NetC7_2: C7.2 R6.1 R9.2 VD4.1 VD6.2 VT2.1 | length 1.2
  Bottom Layer w0.7: 119.69,78.571 C7.2@119.761,77.363
NetC8_2: C8.2 K2.3 K3.2 R13.1 R14.1 | length 113.1
  Top Layer w0.254: 72.04,59.659 73.655,59.659
  Top Layer w3: K2.3@53.213,64.135 53.213,59.911 55.451,57.674 70.056,57.674 ; K3.2@73.85,67.691 73.85,61.468 72.848,60.466 72.04,59.659 70.056,57.674 ; R14.1@87.77,49.327 84.836,49.53 80.803,53.721 70.056,57.674
  Bottom Layer w3: K2.3@53.213,64.135 53.213,62.643 53.213,59.911 54.038,59.087 ; 56.592,62.643 53.911,62.643 54.038,59.087 ; 71.85,59.595 73.85,61.595 K3.2@73.85,67.247 ; R14.1@87.846,49.364 85.064,49.364 84.836,49.592 84.789,49.592 80.806,53.575 71.138,57.442 70.346,58.091 69.532,57.277 55.847,57.277 54.038,59.087
NetC9_2: C9.2 K1.3 R13.2 VD10.3 | length 45.5
  Top Layer w0.254: v5@88.773,63.925 v5(88.773,64.008)
  Top Layer w2: 66.802,73.533 cw(c66.802,43.326) 68.576,73.481 cw(c66.802,43.326) v5@88.884,63.937 ; v5(88.773,64.008) 88.806,64.008 v5@88.99,63.824
  Top Layer w5: K1.3@66.929,64.822 66.929,70.499 68.183,72.77 68.544,73.422 68.576,73.481 VD10.3@71.074,78.004
  Bottom Layer w0.254: K1.3@67.433,64.287 K1.3@67.437,64.278
  Bottom Layer w2: R13.2@64.907,61.968 67.345,64.406 K1.3@67.48,64.541 ; v5@88.99,63.824 90.006,62.808 90.006,61.781
NetC10_1: C10.1 C11.2 R11.1 R84.1 R85.1 R86.1 R87.1
NetC12_2: C12.2 C13.1 T2.13 T2.14
NetC15_2: C15.2 C16.1 R16.1 R17.2 | length 14.3
  Bottom Layer w1: C15.2@11.841,39.235 11.992,39.386 14.191,39.386 16.032,41.227 16.032,46.532 17.054,47.554 ; R17.2@17.248,48.768 18.097,47.919 C16.1@19.431,47.919
NetC17_1: C17.1 D3.2 T1.2 | length 26
  Top Layer w1: T1.2@30.658,34.671 30.658,33.905 31.698,32.865 35.963,32.865 37.687,34.589 C17.1@40.392,34.589 ; D3.2@35.717,43.593 38.735,43.593 42.291,40.037 42.291,36.754 C17.1@40.259,34.722
  Bottom Layer w0.4: D3.2@35.717,43.593 D3.2@35.86,43.45
NetC18_2: C18.2 R21.1 VD11.2 | length 7
  Bottom Layer w1: R21.1@21.288,41.418 22.24,40.465 23.176,39.529 VD11.2@23.176,38.005
  Bottom Layer w1.5: 22.597,40.823 C18.2@24.59,42.815
NetC19_2: C19.2 D3.5 D4.4 | length 21.7
  Bottom Layer w0.7: D3.5@28.097,48.673 31.669,48.673 C19.2@31.669,48.514 31.738,48.445 31.738,47.383 32.639,46.482 32.639,37.973 34.136,36.476 36.681,36.476 37.306,37.1 37.306,38.131 D4.4@37.656,38.481
NetC26_1: C26.1 C56.2 D2.5 D6.1 D8.4 R62.2 R66.2 | length 168.7
  Bottom Layer w0.254: 92.964,54.102 92.972,54.11 ; D2.5@96.233,51.436 D2.5@96.233,51.51
  Bottom Layer w0.4: 92.964,54.102 ccw(c94.19,52.876) 92.456,52.876 92.456,45.466 ccw(c93.797,45.466) 92.849,44.518 93.091,44.275 ; 92.972,54.11 cw(c93.853,53.228) 93.853,54.475 cw(c93.853,53.346) 94.651,54.144 95.489,53.306 cw(c93.693,51.51) D2.5@96.233,51.51 ; D8.4@93.853,39.497 94.361,39.497 94.742,39.116 94.742,30.988 96.012,29.718 102.997,29.718 ; D8.4@93.853,40.005 93.686,40.172 92.456,40.172 92.202,40.426 92.202,43.386 93.091,44.275 ; R66.2@97.409,42.736 97.409,44.643 R62.2@97.396,44.656 C56.2@94.996,44.656 93.472,44.656 93.091,44.275
  Bottom Layer w0.7: D6.1@8.285,12.041 C26.1@10.668,9.658 ; C26.1@11.049,9.398 11.049,8.128 16.637,2.54 97.028,2.54 102.489,8.001 102.489,25.781 103.505,26.797 103.505,29.21 102.997,29.718
NetC28_2: C28.2 D11.3 R25.1 XS1.1 | length 42.9
  Bottom Layer w0.254: 58.465,25.128 58.465,25.34
  Bottom Layer w0.3: D11.3@42.241,18.801 43.616,18.801 45.064,20.249 45.064,28.567 45.774,29.278 46.797,29.278 C28.2@46.905,29.386 47.155,29.386 48.023,28.518 58.207,28.518 59.415,27.31 59.415,26.289 58.465,25.34 ; 58.465,25.128 58.465,21.909 59.531,20.844 61.63,20.844 62.022,20.452 62.022,19.603 62.288,19.337 62.288,17.445 XS1.1@60.469,15.626
NetC29_2: C29.2 D7.37 X3.2 | length 7.9
  Bottom Layer w0.3: D7.37@74.547,23.392 74.57,23.369 75.487,23.369 76.115,22.741 78.934,22.741 79.036,22.639 80.81,22.639 81.576,21.873 C29.2@81.576,21.623
NetC30_2: C30.2 D7.34 X3.1 | length 6.4
  Bottom Layer w0.3: D7.34@75.997,25.842 78.373,25.842 79.036,25.179 79.188,25.027 80.941,25.027 81.592,24.376 C30.2@81.592,24.163
NetC31_2: C31.2 D7.7 | length 3.6
  Bottom Layer w0.3: C31.2@65.05,25.941 65.347,26.238 65.347,26.705 66.463,27.821 66.495,27.821 66.516,27.842 D7.7@67.597,27.842
NetC43_2: C43.2 D11.12 R45.2 R46.1 | length 22.7
  Bottom Layer w0.3: D11.12@48.141,18.801 48.269,18.673 49.132,18.673 49.766,18.039 50.644,18.039 50.652,18.031 54.931,18.031 55.812,18.912 56.062,18.912 56.3,18.674 58.018,18.674 58.907,19.563 58.907,20.468 56.51,22.865 R45.2@55.986,22.865 55.736,22.865 54.764,21.893 51.585,21.893 51.414,21.722 51.414,20.979 C43.2@51.303,20.868
NetC44_1: C44.1 C45.2 L2.2 R46.2 XS3.1 | length 147.8
  Top Layer w0.762: v1@58.372,13.351 59.69,12.032 59.69,10.381 60.912,9.16 68.896,9.16 72.54,12.804 ; 72.54,12.827 96.647,12.827 98.679,14.859 172.847,14.859 179.324,21.336 L2.2@179.324,35.941
  Bottom Layer w0.254: R46.2@56.049,17.039 56.049,15.787 v1(58.358,13.478)
NetC44_2: C44.2 C45.1 T2.5 T2.6 T2.7 VT6.3 VT7.3 VT8.3 | length 1.8
  Bottom Layer w2: C44.2@177.673,49.886 179.428,49.886
  other v2: 140.208,24.892 126.111,25.019 154.305,25.019 173.444,25.273 173.274,49.784
NetC46_1: C46.1 C47.2 D11.9 R60.2 | length 14.7
  Bottom Layer w0.254: D11.9@48.141,22.611 46.845,22.611 46.207,23.249 46.207,25.342 47.524,26.659 C46.1@51.303,26.659 51.366,26.722 53.636,26.722 C47.2@53.7,26.786 ; C47.2@53.652,26.659 R60.2@55.986,26.659
NetC46_2: C46.2 C48.2 D11.10 R50.1 R59.2 | length 14.1
  Bottom Layer w0.254: D11.10@48.141,21.341 48.299,21.182 49.191,21.182 ; C46.2@51.303,24.659 50.132,24.659 49.636,24.163 49.636,21.626 49.191,21.182 ; C48.2@53.652,20.868 53.652,18.912 51.414,18.912 51.302,19.023 50.283,19.023 49.509,19.797 49.509,20.865 49.191,21.182
NetC51_2: C51.2 D9.5 | length 8.7
  Bottom Layer w0.4: C51.2@101.569,43.858 107.467,43.858 108.44,44.831 D9.5@108.44,46.275
NetC52_1: C52.1 D9.4 R69.1 R70.2 | length 24.3
  Bottom Layer w0.254: 100.615,40.358 100.648,40.324 ; 102.616,44.735 102.616,44.726 102.765,44.577 106.52,44.577 106.912,44.969
  Bottom Layer w0.3: 100.615,44.546 100.615,44.579 101.048,45.012 102.339,45.012 102.616,44.735
  Bottom Layer w0.33: 100.615,40.358 100.615,44.546 ; 100.648,40.324 100.648,40.008 R70.2@103.14,37.516
  Bottom Layer w0.4: C52.1@103.14,35.56 R70.2@103.14,37.516 ; 106.912,44.969 107.17,45.227 D9.4@107.17,46.275 107.17,47.335 107.95,48.116 107.95,49.391 109.554,50.994 R69.1@109.554,51.244
NetC52_2: C52.2 D9.13 D9.14 R70.1 | length 6.9
  Bottom Layer w0.4: C52.2@105.14,35.179 105.14,37.516 105.14,37.766 105.9,38.526 D9.14@105.9,40.475 D9.13@107.17,40.475
NetC53_2: C53.2 D9.9 R72.2 R75.2 | length 7.2
  Bottom Layer w0.4: D9.9@112.25,40.475 112.25,39.896 112.268,39.878 114.189,39.878 114.189,39.497 114.189,37.764 C53.2@114.377,37.576 ; C53.2@114.3,37.576 C53.2@114.377,37.576 ; R72.2@116.586,37.576 C53.2@114.377,37.576
NetC54_2: C54.2 D9.10 R74.2 R76.2 | length 9.7
  Bottom Layer w0.4: C54.2@109.71,37.576 111.081,37.576 ; R74.2@112.014,37.576 111.081,37.576 ; R76.2@114.062,41.91 113.86,42.112 111.581,42.112 111.139,41.67 111.139,40.634 D9.10@110.98,40.475 111.081,40.374 111.081,37.576
NetD1_1: D1.1 R75.1 | length 12.2
  Bottom Layer w0.254: R75.1@116.189,39.751 cw(c116.316,39.751) R75.1@116.316,39.878
  Bottom Layer w0.4: R75.1@116.316,39.878 117.348,39.878 117.856,40.386 D1.1@117.856,50.64
NetD1_2: D1.2 R76.1 | length 9.4
  Bottom Layer w0.4: R76.1@116.189,42.037 116.499,42.347 116.933,42.347 117.081,42.496 117.081,48.427 116.586,48.923 D1.2@116.586,50.64
NetD1_4: D1.4 R2.2 | length 23
  Bottom Layer w0.4: R2.2@109.855,70.625 109.955,70.625 110.49,70.089 110.49,53.848 110.871,53.467 112.776,53.467 114.145,52.098 114.145,50.739 D1.4@114.046,50.64
NetD1_7: D1.7 R3.2 | length 24.2
  Bottom Layer w0.254: 129.747,58.928 129.794,58.928
  Bottom Layer w0.4: 117.221,53.975 119.511,53.975
  Bottom Layer w0.5: D1.7@116.586,56.04 116.586,54.61 117.221,53.975 ; 119.511,53.975 ccw(c119.511,64.189) 126.734,56.967
  Bottom Layer w0.7: 126.734,56.967 127.951,58.184 cw(c129.747,56.388) 129.747,58.928
  Bottom Layer w0.78: 129.794,58.928 R3.2@137.565,58.928
NetD2_3: D2.3 R1.1 R4.2 | length 7.7
  Bottom Layer w0.254: R4.2@97.978,56.277 R4.2@98.425,56.277 ccw(c98.425,55.985) R4.2@98.133,55.985
  Bottom Layer w0.5: R4.2@98.133,55.985 D2.3@98.133,54.18 ccw(c98.99,54.18) 98.99,53.324 R1.1@102.616,53.324
NetD2_4: D2.4 D9.16 R1.2 | length 16.3
  Top Layer w0.254: 102.676,48.147 cw(c100.88,46.351) 103.42,46.351
  Top Layer w0.4: v1(99.557,51.267) 102.676,48.147 ; v1(103.42,42.545) 103.42,46.351
  Bottom Layer w0.254: v1(99.557,51.267) cw(c99.614,51.267) 99.558,51.279 cw(c99.614,51.267) v1@99.614,51.324 ; v1@103.36,42.399 cw(c103.566,42.399) v1(103.42,42.545)
  Bottom Layer w0.4: D2.4@98.133,51.38 v1@99.043,51.38 ; v1@99.614,51.324 R1.2@102.616,51.324 ; D9.16@103.36,40.475 v1@103.36,42.399
NetD3_7: D3.7 D3.8 T1.4 VD11.1 | length 10.2
  Bottom Layer w2.5: 25.938,34.245 25.938,34.576 26.954,35.592 26.954,38.33 28.097,39.473 D3.8@28.097,41.053 D3.7@28.097,43.593
NetD4_1: D4.1 R23.2 R24.1 | length 7.9
  Bottom Layer w1: R24.1@35.412,24.543 38.13,24.543 R23.2@37.984,24.689 ; D4.1@37.656,29.591 37.656,24.747 R23.2@37.749,24.654
NetD7_11: D7.11 R26.1 | length 10.4
  Bottom Layer w0.3: R26.1@62.272,34.466 62.284,34.455 62.903,34.455 63.542,33.815 65.764,33.815 65.955,33.624 65.955,32.393 67.352,30.996 68.476,30.996 68.876,30.596 68.876,30.105 68.613,29.842 D7.11@67.987,29.842
NetD7_12: D7.12 R27.1 | length 8.2
  Bottom Layer w0.3: R27.1@60.224,30.64 60.224,30.823 60.588,31.187 61.041,31.187 61.231,31.377 65.701,31.377 66.705,30.373 D7.12@67.597,30.373
NetD7_13: D7.13 R28.1 | length 6.5
  Bottom Layer w0.3: R28.1@64.685,34.815 65.864,34.815 66.463,34.215 66.463,32.71 67.381,31.792 D7.13@69.016,31.792
NetD7_16: D7.16 R31.1 | length 4.8
  Bottom Layer w0.3: R31.1@67.86,34.466 67.86,33.526 68.231,33.155 70.398,33.155 70.547,33.006 D7.16@70.547,32.059
NetD7_17: D7.17 R44.2 | length 36.8
  Top Layer w0.3: v1(51.287,12.705) 51.287,23.754 57.375,29.842 v1(70.146,29.842)
  Bottom Layer w0.3: R44.2@51.207,14.483 51.247,14.443 51.247,12.745 v1(51.287,12.705) ; v1(70.146,29.842) 70.562,29.842 71.051,30.331 D7.17@71.051,31.792
NetD7_18: D7.18 R36.2 | length 3.5
  Bottom Layer w0.3: R36.2@70.146,34.466 70.33,34.466 70.693,34.102 70.693,33.624 71.162,33.155 71.329,33.155 71.547,32.937 D7.18@71.547,31.792
NetD7_19: D7.19 R41.2 | length 2.8
  Bottom Layer w0.3: D7.19@72.047,31.792 72.047,32.637 72.047,32.96 72.432,33.345 R41.2@72.432,34.466
NetD7_25: D7.25 R37.1 | length 9.9
  Bottom Layer w0.3: D7.25@75.997,30.342 D7.25@76.547,30.342 ; D7.25@75.997,30.373 76.547,30.373 77.957,31.783 77.957,32.009 77.919,37.573 78.001,37.573 78.466,38.038 R37.1@78.782,38.038
NetD7_26: D7.26 R35.2 | length 9.2
  Bottom Layer w0.3: D7.26@76.496,29.842 76.866,29.842 80.116,33.091 80.116,35.295 80.675,35.855 81.356,35.855 81.719,36.219 R35.2@81.719,36.228
NetD7_27: D7.27 R33.2 | length 7.6
  Bottom Layer w0.3: D7.27@75.997,29.345 77.258,29.345 81.252,33.338 81.356,33.338 81.719,33.702 R33.2@81.719,33.815
NetD7_28: D7.28 R34.2 | length 6.4
  Bottom Layer w0.3: D7.28@76.369,28.837 78.147,28.837 80.339,31.029 81.356,31.029 81.719,31.393 R34.2@81.719,31.402
NetD7_29: D7.29 R47.2 | length 39
  Top Layer w0.3: v1(56.34,12.843) 56.34,16.869 59.161,19.69 59.161,25.251 59.656,25.747 74.87,25.747 75.925,26.802 75.925,27.691 75.946,27.713 75.946,27.923 75.305,28.565 v1(74.02,28.565)
  Bottom Layer w0.3: R47.2@55.081,14.483 55.081,13.229 55.467,12.843 v1(56.34,12.843) ; v1(74.02,28.565) 74.242,28.342 D7.29@75.997,28.342
NetD7_30: D7.30 R29.1 | length 6.2
  Bottom Layer w0.3: D7.30@75.997,27.842 78.803,27.842 79.577,28.616 81.356,28.616 81.719,28.98 R29.1@81.719,28.989
NetD7_31: D7.31 R30.1 | length 6.1
  Bottom Layer w0.3: D7.31@75.997,27.342 81.264,27.342 81.719,26.886 R30.1@81.719,26.703
NetD7_32: D7.32 D11.1 D11.2 | length 44.1
  Top Layer w0.3: v1(58.018,26.703) 58.323,26.397 73.675,26.397 v1(74.063,26.786)
  Bottom Layer w0.254: D11.1@42.241,16.261 D11.2@42.241,17.531
  Bottom Layer w0.3: D11.2@42.241,17.531 44.058,17.531 45.676,19.148 45.676,26.144 47.223,27.691 56.696,27.691 57.693,26.694 58.008,26.694 v1(58.018,26.703) ; v1(74.063,26.786) 74.785,26.786 74.841,26.842 D7.32@75.997,26.842
NetD7_38: D7.38 S1.1 | length 20.3
  Bottom Layer w0.254: D7.38@74.047,23.392 74.047,22.311 77.446,18.912 87.837,18.912 88.815,17.934 88.815,16.426 S1.1@89.593,15.648
NetD7_39: D7.39 S1.2 | length 18.9
  Bottom Layer w0.254: 73.555,21.773 D7.39@73.555,23.392 ; 73.578,21.773 76.948,18.404 86.466,18.404 87.053,17.816 S1.2@87.053,15.648
NetD7_40: D7.40 S1.3 | length 16.7
  Bottom Layer w0.254: 73.047,21.479 D7.40@73.047,23.392 ; 73.078,21.479 74.851,19.706 74.887,19.706 76.697,17.896 83.899,17.896 84.513,17.281 S1.3@84.513,15.648
NetD7_41: D7.41 S1.4 | length 14.1
  Bottom Layer w0.254: D7.41@72.547,22.887 72.547,21.217 76.406,17.359 81.452,17.359 81.973,16.838 S1.4@81.973,15.648
NetD7_42: D7.42 S1.5 | length 12.1
  Bottom Layer w0.254: D7.42@72.047,23.392 72.047,22.311 72.051,22.307 72.051,20.797 ; 72.078,20.844 72.078,20.797 76.025,16.851 78.23,16.851 S1.5@79.433,15.648
NetD7_43: D7.43 S1.6 | length 10.3
  Bottom Layer w0.254: D7.43@71.547,23.392 71.547,20.518 76.301,15.764 S1.6@77.041,15.764
NetD7_44: D7.44 R32.1 | length 15.7
  Top Layer w0.3: v1(68.805,12.122) 68.805,16.291 70.691,18.177 v1(71.961,18.177)
  Bottom Layer w0.254: 71.047,20.267 D7.44@71.047,23.392 ; 71.072,20.267 71.072,19.066 v1(71.961,18.177)
  Bottom Layer w0.3: v1(68.805,12.122) 68.833,12.15 68.833,14.047 68.805,14.074 R32.1@68.86,14.13
NetD7_45: D7.45 S1.7 | length 10.3
  Bottom Layer w0.254: D7.45@70.547,23.392 70.547,21.909 70.564,21.893 70.564,17.796 71.267,17.092 72.909,17.092 S1.7@74.353,15.648
NetD7_46: D7.46 S1.8 | length 8.5
  Bottom Layer w0.254: D7.46@70.047,23.392 70.047,17.414 S1.8@71.813,15.648
NetD8_1: D8.1 R31.2 | length 23.9
  Top Layer w0.4: v3(66.082,36.228) 67.761,34.549 77.157,34.549 v1@82.375,39.767
  Bottom Layer w0.3: v3(66.082,36.228) 66.141,36.169 67.563,36.169 R31.2@67.86,36.466
  Bottom Layer w0.7: v1(82.375,39.695) D8.1@85.182,39.695
NetD8_3: D8.3 D9.1 R61.2 | length 16.3
  Bottom Layer w0.3: 95.236,41.67 98.312,41.67 98.665,42.023 98.665,47.103 98.964,47.402 102.331,47.402
  Bottom Layer w0.4: D8.3@93.853,42.037 D8.3@93.865,42.049 ; D8.3@94.361,42.545 95.236,41.67 ; R61.2@101.585,46.271 101.589,46.275 102.235,46.275 ; 102.331,47.402 102.616,47.117 102.616,46.275 D9.1@103.36,46.275
NetD9_2: D9.2 R64.1 R65.2 | length 6.6
  Bottom Layer w0.4: D9.2@104.63,46.275 104.608,46.297 104.608,47.581 104.152,48.037 104.152,48.641 103.855,48.938 103.886,48.969 103.886,50.165 104.421,50.7 R65.2@106.03,50.7
NetD9_3: D9.3 R65.1 | length 2.5
  Bottom Layer w0.4: D9.3@105.9,46.275 105.9,48.57 R65.1@106.03,48.7
NetD9_6: D9.6 R68.1 | length 2.6
  Bottom Layer w0.4: R68.1@109.617,48.86 109.663,48.813 109.663,46.321 D9.6@109.71,46.275